# Altium PCB MD48-BC911-MCU-261020.PcbDoc
Units mm, origin at the board's own origin, x right, y up, seen from the top; angles counter-clockwise.
Board outline 124 x 22 mm, 4 copper layers (Top Layer, Mid-Layer1, Mid-Layer2, Bottom Layer), stack 0.778 mm thick; 83 components, 61 nets, 257 pads, 185 vias.
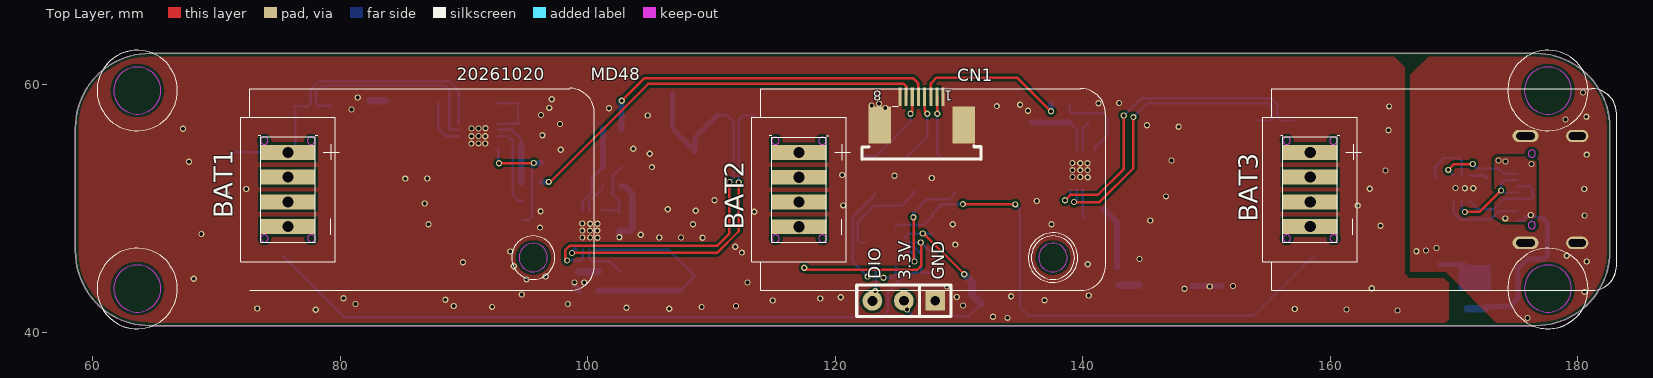
[diagram p0: Top Layer view]
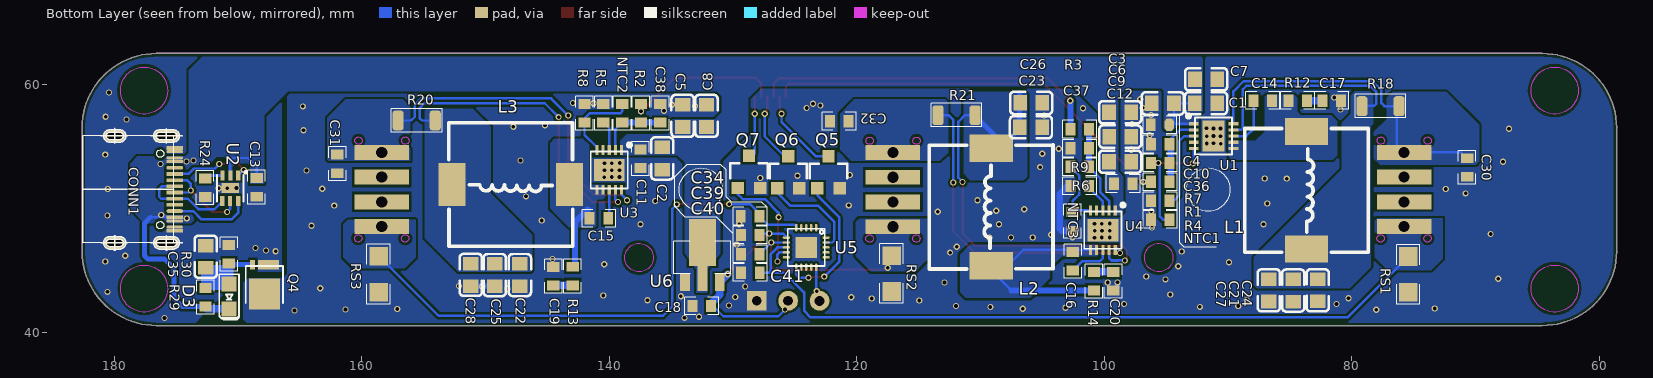
[diagram p1: Bottom Layer view, seen from below]

## Layer stack, top to bottom
Top Solder: solder mask 0.0102, Solder Resist, Dk 3.5
Top Layer: signal copper 0.0356
Dielectric 1: core 0.254, FR-4, Dk 4.2
Mid-Layer1: signal copper 0.036
Dielectric 3: prepreg 0.127, Dk 4.2
Mid-Layer2: signal copper 0.036
Dielectric 2: core 0.254, Dk 4.2
Bottom Layer: signal copper 0.0356
Bottom Solder: solder mask 0.0102, Solder Resist, Dk 3.5

## Board outline
58.602,46.52 58.602,56.52 cw(c64.602,56.52) 64.602,62.52 64.591,62.522 176.6,62.522 176.602,62.52 cw(c176.602,56.52) 182.602,56.52 182.602,46.52 cw(c176.602,46.52) 176.602,40.52 64.602,40.52 cw(c64.602,46.52)

## Design rules (kind name [scope] priority, off if disabled: settings)
Clearance [All] p1: gap=0.2 ignorepadtopadclearanceinfootprint=FALSE
ComponentClearance [All] p1: gap=0 collisioncheckmode=3 verticalgap=0 showdistances=FALSE
PlaneConnect [All] p1: planeconnectstyle=Direct reliefexpansion=0.508 reliefentries=4 reliefconductorwidth=0.254 reliefairgap=0.254
PolygonConnect [All] p1: connectstyle=Direct reliefconductorwidth=0.254 reliefentries=4 polygonreliefangle="90 Angle" airgapwidth=0.254
RoutingVias [All] p1: holewidth=0.711 width=1.27 viastyle="Through Hole" minholewidth=0.3 minwidth=0.5 maxholewidth=0.711 maxwidth=1.27
SilkToSilkClearance [All] p1: silktosilkclearance=0.1
SilkToSolderMaskClearance [IsPad] p1: minsilkscreentomaskgap=0.1 clearancetoexposedcopper=TRUE
SolderMaskExpansion [All] p1: expansion=0.102 istentingtop=FALSE
Width [All] p1: maxlimit=10 minlimit=0.1 preferedwidth=0.15
26 further rules are at their usual default settings.

## Classes and differential pairs
component class HUSB337+SW6201+SW6201+SW6201+PY32F031(1)(3): C1 C2 C3 C4 C5 C6 C7 C8 C9 C10 C11 C12 C14 C15 C16 C17 C18 C19 C20 C21 C22 C24 C25 C26 C27 C28 C30 C31 C32 CONN1 L1 L2 L3 NTC1 NTC2 NTC3 R1 R2 R3 R4 R5 R6 R7 R8 R9 R14 R18 R20 R21 RS1 U1 U3

## Components (designator, comment, footprint, x,y, rotation, side; value= is the part's Value field where it differs from the comment)
BAT1 "Comment" "电池座 -2-4PIN-2.0MM" 75.771,51.522 r90 top locked
BAT2 "Comment" "电池座 -2-4PIN-2.0MM" 117.081,51.512 r90 top locked
BAT3 "Comment" "电池座 -2-4PIN-2.0MM" 158.391,51.522 r90 top locked
C1 "10uF/16V X5R 10%" "SMD-C0805 锡膏" 90.88,58.5 r0 bottom locked (schematic designator C4)
C2 "10uF/16V X5R 10%" "SMD-C0805 锡膏" 135.73,53.13 r90 bottom locked
C3 "NC" "SMD-C0805 锡膏" 97.82,57.77 r0 bottom locked
C4 "NC" "SMD-C0805 锡膏" 96.17,58.48 r180 bottom locked (schematic designator C1)
C5 "NC" "SMD-C0805 锡膏" 134.08,58.37 r270 bottom locked
C6 "NC" "SMD-C0805 锡膏" 97.81,55.8 r0 bottom locked
C7 "NC" "SMD-C0805 锡膏" 90.87,60.43 r0 bottom locked
C8 "NC" "SMD-C0805 锡膏" 132.15,58.37 r270 bottom locked
C9 "10uF/16V X5R 10%" "SMD-C0805 锡膏" 97.82,53.77 r0 bottom locked
C10 "0.1uF" 0603#1 95.5,56.75 r180 bottom locked
C11 "0.1uF" 0603#2 137.48,54.02 r90 bottom locked
C12 "0.1uF" 0603#2 98.47,51.99 r0 bottom locked
C13 "1UF/50V" 0603#2 168.51,51.69 r270 bottom locked
C14 "0.1uF" 0603#2 87.2,58.7 r0 bottom locked
C15 "0.1uF" 0603#2 140.84,49.19 r180 bottom locked
C16 "0.1uF" 0603#2 102.54,45.72 r270 bottom locked
C17 "1nF" 0603#2 81.62,58.7 r0 bottom locked
C18 "NC" 0603#2 132.53,42.11 r0 bottom locked
C19 "1nF" 0603#2 144.53,44.52 r270 bottom locked
C20 "1nF" 0603#2 99.28,44.12 r90 bottom locked
C21 "22uF/16V X5R 10%" "SMD-C0805 锡膏" 84.73,42.46 r90 bottom locked
C22 "NC" "SMD-C0805 锡膏" 147.23,43.71 r90 bottom locked
C23 "22uF/16V X5R 10%" "SMD-C0805 锡膏" 105.03,56.55 r0 bottom locked (schematic designator C29)
C24 "22uF/16V X5R 10%" "SMD-C0805 锡膏" 82.76,42.48 r90 bottom locked (schematic designator C27)
C25 "22uF/16V X5R 10%" "SMD-C0805 锡膏" 149.26,43.71 r90 bottom locked
C26 "22uF/16V X5R 10%" "SMD-C0805 锡膏" 105.01,58.52 r0 bottom locked
C27 "NC" "SMD-C0805 锡膏" 86.71,42.47 r90 bottom locked (schematic designator C24)
C28 "22uF/16V X5R 10%" "SMD-C0805 锡膏" 151.2,43.72 r90 bottom locked
C30 "1UF/50V" 0603#2 70.68,53.3 r90 bottom locked
C31 "1uF/50V" 0603#2 161.98,53.59 r90 bottom locked
C32 "1UF/50V" 0603#2 121.43,57.04 r180 bottom locked
C34 "0.1uf/50v" 0603#2 128.63,49.36 r180 bottom locked (schematic designator C3)
C35 "10uF/16V X5R 10%" "SMD-C0805 锡膏" 172.62,45.19 r90 bottom locked (schematic designator C21)
C36 "10nF/50V" 0603#2 95.49,55.18 r180 bottom locked (schematic designator C14)
C37 "10nF/50V" 0603#2 101.98,54.85 r180 bottom locked (schematic designator C14)
C38 "10nF/50V" 0603#2 135.89,57.69 r270 bottom locked (schematic designator C14)
C39 "2.2uf/50v" 0603#2 128.62,47.85 r0 bottom locked (schematic designator C3)
C40 "0.1uf/50v" 0603#2 128.61,46.3 r180 bottom locked (schematic designator C3)
C41 "0.1uf/50v" 0603#2 128.6,44.8 r180 bottom locked (schematic designator C3)
CN1 "" 连接器0.5*8 127,57.87 r180 top locked
CONN1 "输入" "SMD-TYPEC_16Pin 卧式" 174.54,47.21 r0 bottom locked
D3 "1N4148" SOD-323 170.73,42.88 r90 bottom locked
L1 "4.7uH" "SMD-L WHC1040 锡膏" 83.66,56.2 r270 bottom locked
L2 "4.7uH" "SMD-L WHC1040 锡膏" 109.14,45.36 r90 bottom locked (schematic designator L3)
L3 "4.7uH" "SMD-L WHC1040 锡膏" 143.22,51.93 r0 bottom locked (schematic designator L2)
NTC1 "NC" 0603#2 95.49,49.09 r0 bottom locked (schematic designator NTC)
NTC2 "NC" 0603#2 138.96,57.69 r270 bottom locked (schematic designator R8)
NTC3 "NC" 0603#2 102.56,48.94 r270 bottom locked (schematic designator NTC2)
Q4 "SLN30N03T" DFN33-1 168.18,44.27 r0 bottom locked (schematic designator Q1)
Q5 "2N7002" SOT323 122.29,53.02 r90 bottom locked
Q6 "2N7002" SOT323 125.54,53.02 r90 bottom locked
Q7 "2N7002" SOT323 128.72,53.04 r90 bottom locked
R1 "10K" 0603#2 95.48,52.14 r0 bottom locked
R2 "10K" 0603#2 137.44,57.69 r90 bottom locked
R3 "10K" 0603#2 101.98,56.39 r0 bottom locked
R4 "820K" 0603#2 95.49,50.61 r0 bottom locked
R5 "820K" 0603#2 140.49,57.69 r90 bottom locked
R6 "820K" 0603#2 101.99,51.81 r0 bottom locked
R7 "NC" 0603#2 95.49,53.66 r180 bottom locked
R8 "NC" 0603#2 142.01,57.69 r90 bottom locked (schematic designator NTC1)
R9 "NC" 0603#2 101.99,53.35 r180 bottom locked
R12 "4.7R" 0603#2 84.38,58.7 r180 bottom locked
R13 "4.7R" 0603#2 142.97,44.53 r270 bottom locked
R14 "4.7R" 0603#2 100.84,44.11 r90 bottom locked
R18 "22mr" 1206A 77.68,58.26 r0 bottom locked
R20 "22mr" 1206A 155.57,57.1 r180 bottom locked
R21 "22mr" 1206A 111.94,57.53 r180 bottom locked
R24 "nc" 0603#2 172.67,51.67 r270 bottom locked (schematic designator R15)
R29 "20K" 0603#2 172.64,42.81 r90 bottom locked (schematic designator R4)
R30 "200K" 0603#2 170.75,46.3 r90 bottom locked (schematic designator R4)
RS1 "0.05R" 1206 75.43,44.66 r90 bottom locked (schematic designator R10)
RS2 "0.05R" 1206 117.19,44.73 r90 bottom locked (schematic designator R10)
RS3 "0.05R" 1206 158.65,44.67 r90 bottom locked (schematic designator R10)
U1 "BC911 DNF" "DFN33 - 10PIN" 91.17,55.84 r270 bottom locked
U2 "HUSB237" HUSB237 170.3,51.85 r270 bottom locked
U3 "BC911 DNF" "DFN33 - 10PIN" 140.01,53.1 r0 bottom locked
U4 "BC911 DNF" "DFN33 - 10PIN" 100.12,48.24 r0 bottom locked
U5 "WY8S8002A" QFN3*3-20 124.09,46.84 r270 bottom locked
U6 "ME6203A33PG" SOT-89 132.48,46.03 r90 bottom locked
? "UC2605" SIP3 128.09,42.53 r180 top locked

## Footprints (in the part's own frame and the unit in brackets; to place one, negate y for a bottom-side part, rotate by r counter-clockwise, add the part's x,y. Pads: shape width x height; smd on the part's side, far side on the other; paste and mask are expansions set on the pad)
0603#1 [mm]
  oct 0.8x1 smd: 1(0.75,0)
  rect 0.8x1 smd: 2(-0.75,0)
  silkscreen extent -1.37,-0.71 1.37,0.71
0603#2 [mm]
  rect 0.8x1 smd: 1(0.75,0) 2(-0.75,0)
  silkscreen extent -1.37,-0.71 1.37,0.71
1206 [mm]
  rect 1.5x1.5 smd: 1(1.448,0) 2(-1.448,0)
  silkscreen extent -2.41,-0.94 2.41,0.94
1206A [mm]
  rrect50% 0.9x1.6 smd mask+0.102: 1(1.5,0) 2(-1.5,0)
  silkscreen extent -2.05,-0.95 2.05,0.95
"DFN33 - 10PIN" [mm]
  rect 0.25x0.8 smd: 1(-1,-1.6) 2(-0.5,-1.6) 3(0,-1.6) 4(0.5,-1.6) 5(1,-1.6) 6(1,1.6) 7(0.5,1.6) 8(0,1.6) 9(-0.5,1.6) 10(-1,1.6)
  rect 2.5x1.8 smd: 11(0,0)
  silkscreen extent -1.66,-2.06 1.5,1.5
DFN33-1 [mm]
  rect 0.4x0.8 smd: 1(0.65,-1.175)
  rect 2.5x2.5 smd: 2(-0.3,1.175)
  rect 1.7x0.8 smd: 3(-0.65,-1.175)
  silkscreen extent -1.8,-1.07 1.2,1.93
HUSB237 [mil]
  rect 31.5x13.23 smd: "1 CC1"(-32,12) "2 VBUS"(-32,-13) "3 VSET"(-32,-38) "4 D+"(49,-39) "5 D-"(49,-14) "6 "(49,12)
  rect 31.5x55.12 smd: EP(8,-13)
  silkscreen extent -45,-56 50,40
QFN3*3-20 [mm]
  oval 0.6x0.2 smd: 1(-1.6,0.8) 2(-1.6,0.4) 3(-1.6,0) 4(-1.6,-0.4) 5(-1.6,-0.8) 11(1.6,-0.8) 12(1.6,-0.4) 13(1.6,0) 14(1.6,0.4) 15(1.6,0.8)
  oval 0.2x0.6 smd: 6(-0.8,-1.6) 7(-0.4,-1.6) 8(0,-1.6) 9(0.4,-1.6) 10(0.8,-1.6) 16(0.8,1.6) 17(0.4,1.6) 18(0,1.6) 19(-0.4,1.6) 20(-0.8,1.6)
  rect 1.7x1.7 smd: 21(0,0)
  silkscreen extent -1.5,-1.5 1.5,1.5
SIP3 [mm]
  rect 1.6x1.6 hole 0.8: 1(0,0)
  round 1.6 hole 0.8: 2(2.54,0)
  round 1.6 hole 0.813: 3(5.08,0)
  silkscreen extent -1.27,-1.27 6.35,1.27
"SMD-C0805 锡膏" [mm]
  rect 1.1x1.25 smd: 1(0,0) 2(1.8,0)
  silkscreen extent -0.8,-0.9 2.6,0.9, body extent -0.1,-0.64 1.9,0.61, height 1.25
"SMD-L WHC1040 锡膏" [mm]
  rect 2.2x3.5 smd: 1(0,0) 2(9.492,0)
  silkscreen extent -0.26,-5 9.75,5, body extent -0.45,-5 9.95,5, height 3.9
"SMD-TYPEC_16Pin 卧式" [mm]
  oval 2.1x1 hole 0.6 slot 1.5 at 0 deg: 0(1.253,-8.64) 0(1.253,0)
  oval 1.8x1 hole 0.6 slot 1.4 at 0 deg: 0(5.433,-8.64) 0(5.433,0)
  round 0.3 on Bottom Overlay: 0(8.033,-4.32)
  rect 1.34x0.3 smd: A1(0.583,-7.67) A5(0.583,-5.57) A6(0.583,-4.57) A7(0.583,-4.07) A8(0.583,-3.07) A12(0.583,-0.97) B4(0.583,-2.07) B6(0.583,-3.57) B7(0.583,-5.07)
  oval 1.34x0.25 smd: A4(0.583,-6.87) A9(0.583,-1.77) B12(0.583,-7.37)
  oval 1.3x0.25 smd: B1(0.583,-1.27)
  oval 1.34x0.3 smd: B5(0.583,-2.57) B8(0.583,-6.07)
  rect 1.34x0.25 smd: B9(0.583,-6.57)
  Keep-Out Layer circle w0.1: c1.753,-7.21 r0.3
  Keep-Out Layer circle w0.1: c1.753,-1.43 r0.3
  silkscreen extent -0.03,-9.25 8.03,0.64
SOD-323 [mm]
  rect 1.2x1.2 smd: 1(1,0) 2(-1,0)
  silkscreen extent -1.85,-0.8 1.8,0.8
SOT323 [mm]
  rect 1x1 smd: 1(-1.4,0.9) 2(1.2,0) 3(-1.4,-0.9)
  silkscreen extent -0.6,-1.5 0.6,1.5
SOT-89 [mm]
  rect 1.4x0.8 smd: 1(-2,1.4) 3(-2,-1.4)
  rect 5x0.8 smd: 2(-0.2,0)
  rect 3.8x2.2 smd: 2(1.225,0)
  silkscreen extent -1.3,-2.3 1.3,2.3
"电池座 -2-4PIN-2.0MM" [mm]
  rect 1.2x4.4 hole 0.9: 1(-3,0) 2(-1,0) 3(1,0) 4(3,0)
  Keep-Out Layer circle w0.1: c3.949,-1.883 r0.3
  Keep-Out Layer circle w0.1: c-3.951,1.892 r0.3
  Keep-Out Layer circle w0.1: c3.95,1.902 r0.3
  Keep-Out Layer circle w0.1: c-3.95,-1.898 r0.3
  silkscreen extent -4.25,-4.14 4.4,2.4
连接器0.5*8 [mm]
  rect 0.25x1.5 smd paste+0 mask+0.051: 1(-1.732,-1.132) 2(-1.232,-1.132) 3(-0.732,-1.132) 4(-0.232,-1.132) 5(0.268,-1.132) 6(0.768,-1.132) 7(1.268,-1.132) 8(1.768,-1.132)
  rect 1.8x3 smd paste+0 mask+0.051: 9(3.388,1.132) 10(-3.388,1.122)
  silkscreen extent -4.78,-0.38 4.83,3.9

## Part data
C1 C2 C3 C4 C5 C6 C7 C8 C9 C10 C11 C12 C13 C14 C15 C16 C17 C19 C20 C21 C22 C23 C24 C25 C26 C27 C28 C30 C31 C32 C34 C35 C36 C37 C38 C39 C40 C41: library part CAP0603, "Capacitor"
C18: library part Cap, "Capacitor"
CONN1: library part "TYPC C"
L1 L2 L3: library part INDUCTOR_SPM1010, "INDUCTOR"
NTC1 NTC3 R8: library part "Res Varistor", "Varistor (Voltage-Sensitive Resistor)"
NTC2 R1 R2 R3 R4 R5 R6 R7 R9 R12 R13 R14 R18 R20 R21 R24 R29 R30 RS1 RS2 RS3: library part RES_0603, "Resistor"
Q4: library part MOSFET-EH-P

## Via types
v1: diameter 0.5, hole 0.3, Top Layer to Bottom Layer, 185 vias

## Nets (pads, with @x,y where several pads share a name; then routed paths per layer and width w, separated by ;. In a path a pad name is that pad's centre, name@x,y a point inside that pad or via, vN(x,y) a via of type N, cw(c..) or ccw(c..) an arc to the next point about the centre after c; other vN are vias at no path point)
3.3V: ?.2 C18.2 C39.2 U5.6 U6.3 | length 17.5
  Top Layer w0.2: v1@127.115,47.995 v1(130.43,44.68)
  Bottom Layer w0.2: ?.2 125.55,42.07 126.34,41.28 130.8,41.28 C18.2@131.8,42.28 ; U5.6 125.69,47.68 125.97,47.96 v1(127.08,47.96) 127.76,47.96 C39.2
  Bottom Layer w0.6: v1(130.43,44.68) U6.3 131.08,43 C18.2@131.8,42.28
  other v1: 125.81,41.83
12V: "U2.2 VBUS" C1.2 C2.2 C3.2 C4.2 C5.2 C6.2 C7.2 C8.2 C9.2 C10.1 C11.1 C12.1 C13.2 CONN1.A4 CONN1.A9 CONN1.B4 CONN1.B9 D3.2 R29.2 U1.1 U3.1 U4.1 U6.2 | length 25.1
  Bottom Layer w0.2: C1.2 94.35,58.5 C4.2 94.37,56.93 94.46,56.84 U1.1 ; C13.2 168.51,53.37 169.21,54.07 170.42,54.07 170.63,53.86 170.63,52.663 ; R29.2 R29.2@172.73,42.06 ; CONN1.A9 175.696,48.98 175.696,49.303 176.496,49.303 176.519,49.28 177.1,49.28
  Bottom Layer w0.4: R29.2@172.73,42.06 174.52,42.06 175.17,42.71 175.17,45.14 175.93,45.9 177.3,45.9 177.57,46.17 177.57,48.81 177.1,49.28
  Bottom Layer w0.6: D3.2@171.06,41.87 172.54,41.87 R29.2@172.73,42.06
  other v1: 174.15,49.19 176.21,49.46 176.27,53.59 174.17,53.78 173.6,53.87
a1: "U2.3 VSET" R24.2 | length 1.5
  Bottom Layer w0.25: 171.265,52.663 172.427,52.663 R24.2
a2: 
a3: 
a4: C35.1 D3.1 Q4.1 R29.1 R30.2 | length 9.3
  Bottom Layer w0.4: Q4.1 170.645,45.445 R30.2 ; R30.2 171.11,45.19 C35.1 172.64,45.17 R29.1 172.32,43.88 D3.1 170.75,43.9 R30.2
a5: Q5.1 U5.11 | length 11.1
  Top Layer w0.2: v1(122.63,44.48) 123.82,44.48 v1(123.91,44.39)
  Bottom Layer w0.2: v1(122.63,44.48) 122.63,44.49 121.41,45.71 121.41,49.26 123.18,51.03 Q5.1@123.18,51.33 ; v1(123.91,44.39) 124.66,44.39 124.89,44.62 U5.11
a6: Q6.1 U5.19 | length 8
  Bottom Layer w0.2: U5.19 121.99,47.24 121.81,47.42 121.81,48.89 123.14,50.22 125.39,50.22 126.366,51.196 126.366,51.33 Q6.1@126.45,51.33
a7: Q7.1 U5.9 | length 9.5
  Top Layer w0.2: v1(126.32,49.28) 126.37,49.23 126.37,45.76 v1(126.42,45.71)
  Bottom Layer w0.2: U5.9 126.25,46.44 126.42,46.27 v1(126.42,45.71) ; v1(126.32,49.28) 126.32,49.64 127.42,50.74 129.22,50.74 129.64,51.16 Q7.1@129.64,51.33
A8: CONN1.A8
a9: ?.3 U5.15 | length 2.9
  Bottom Layer w0.2: ?.3@123.15,42.43 123.29,42.57 U5.15
  other v1: 123.24,43.31
B8: CONN1.B8
CC1: "U2.6 " CONN1.B5 | length 6.6
  Bottom Layer w0.2: 169.985,50.565 169.985,49.655 170.53,49.11 172.96,49.11 173.63,49.78 CONN1.B5
CC2: "U2.1 CC1" CONN1.A5 | length 6.7
  Top Layer w0.2: v1(169.55,53.108) 170.022,53.58 v1(171.52,53.58)
  Bottom Layer w0.2: v1@169.55,53.12 v1(169.55,53.108) 169.995,52.663 ; v1(171.52,53.58) 171.88,53.22 173.56,53.22 174,52.78 CONN1.A5
DM: "U2.5 D-" CONN1.A7 CONN1.B7 | length 7.9
  Top Layer w0.2: v1(170.89,49.71) 172.08,49.71 v1(173.82,51.45)
  Bottom Layer w0.2: 170.646,50.565 170.646,49.954 v1(170.89,49.71) ; CONN1.A7 173.99,51.28 v1(173.82,51.45) 173.82,51.97 174.13,52.28 CONN1.B7
DP: "U2.4 D+" CONN1.A6 CONN1.B6 | length 7.7
  Bottom Layer w0.2: 171.281,50.565 171.916,49.93 173.214,49.93 174.064,50.78 CONN1.B6 176.22,50.78 176.38,50.94 176.38,51.56 176.16,51.78 CONN1.A6
GND: ?.1 C1.1 C2.1 C3.1 C4.1 C5.1 C6.1 C7.1 C8.1 C9.1 C10.2 C11.2 C12.2 C17.2 C18.1 C19.2 C20.2 C21.1 C22.1 C23.1 C24.1 C25.1 C26.1 C27.1 C28.1 C30.2 C31.2 C32.2 C34.2 C36.2 C37.2 C38.2 C39.1 C40.2 C41.2 CN1.1 CN1.8 CN1.9 CN1.10 NTC1.1 NTC3.1 Q4.2 Q5.3 Q6.3 Q7.3 R4.1 R5.1 R6.1 R8.1 RS1.2 RS2.2 RS3.2 U1.11 U3.11 U4.11 U5.21 U6.1 | length 8.7
  Bottom Layer w0.5: v1(98.94,44.02) 98.94,43.71 C20.2 ; v1(102.56,47.66) NTC3.1 103.46,48.19 103.61,48.34 103.61,51.18 102.98,51.81 R6.1 ; C25.1@148.86,43.72 C28.1
  other v1: 133.93,41.15 132.75,41.24 165.45,41.74 78.03,41.81 161.32,41.83 157.14,41.86 73.3,41.9 106.59,41.88 103.13,41.97 109.21,42.02 92.28,42.04 89.18,42.11 111.99,42.11 130.33,42.15 81.23,42.27 98.4,42.27 114.96,42.55 136.92,42.57 88.5,42.62 118.79,42.71 80.27,42.73 120.45,42.82 129.83,42.84 134.22,42.9 140.49,42.95 94.67,43.04 148.23,43.5 163.37,43.54 129.03,43.68 150.28,43.68 152.16,43.73 99.72,44 112.92,44.01 95.06,44.26 68.17,44.31 96.61,44.49 94.02,45.32 140.41,45.49 89.93,45.64 144.6,45.91 112.46,46.42 93.75,46.51 111.93,46.9 129.71,47.07 100.2,47.64 100.8,47.63 109.29,47.63 99.57,47.65 105.79,47.65 107.54,47.65 104.29,47.86 68.78,47.93 99.57,48.2 100.19,48.2 100.78,48.2 96.15,48.44 164.08,48.6 87.14,48.72 108.52,48.71 129.5,48.72 137.49,48.71 100.2,48.75 100.79,48.75 99.56,48.78 145.47,49.02 113.46,49.73 96.2,49.76 108.74,49.81 106.47,49.92 162.23,50.22 120.65,50.24 86.83,50.4 136.29,50.6 110.25,50.66 146.73,50.97 70.8,51.21 72.41,51.56 163.2,51.59 85.26,52.4 87.03,52.42 127.81,52.46 139.18,52.54 139.81,52.53 140.41,52.52 124.79,52.64 120.58,52.7 164.48,53.06 139.18,53.09 139.8,53.09 140.39,53.09 105.19,53.33 139.81,53.64 140.4,53.64 139.17,53.67 67.78,53.77 147.18,53.86 105.01,54.42 97.83,54.74 103.68,54.82 90.6,55.23 91.17,55.25 91.72,55.24 90.61,55.83 91.17,55.84 91.72,55.83 96.34,55.91 164.71,56.31 67.29,56.44 90.62,56.46 91.17,56.46 91.75,56.47 147.76,56.6 145.2,56.72 97.77,56.82 104.85,57.51 96.23,57.55 135.58,57.88 80.92,57.98 101.73,58.09 96.89,58.12 124.06,58.11 164.77,58.24 133.07,58.26 122.95,58.31 134.95,58.37 123.54,58.45 141.29,58.49 142.95,58.51 97.1,58.82 81.42,58.95
GND1: C13.1 C35.2 CONN1.0@175.793,47.21 CONN1.0@175.793,55.85 CONN1.0@179.973,47.21 CONN1.0@179.973,55.85 CONN1.A1 CONN1.A12 CONN1.B1 CONN1.B12 Q4.3 R24.1 R30.1 U2.EP
  other v1: 175.96,41.14 180.56,43.25 180.74,45.71 179.12,46.17 166.97,46.53 167.75,46.6 168.59,46.79 180.57,49.42 180.54,51.56 170.89,51.62 171.56,51.63 170.14,51.64 180.74,54.34 179.02,57.18 180.71,57.4 180.44,59.36
LEDG_1: CN1.7 R1.1 | length 33.7
  Top Layer w0.2: v1(96.85,52.14) 96.978,52.14 104.908,60.07 125.54,60.07 125.732,59.878 CN1.7
  Bottom Layer w0.5: R1.1 v1(96.85,52.14)
LEDG_2: CN1.5 R3.1 | length 28.3
  Top Layer w0.2: v1(102.75,58.69) 104.59,60.53 126.3,60.53 126.732,60.098 CN1.5
  Bottom Layer w0.5: R3.1 102.73,58.67 v1(102.75,58.69)
LEDG_3: CN1.3 R2.1 | length 12.7
  Top Layer w0.2: CN1.3 127.732,60.102 128.2,60.57 134.71,60.57 135.87,59.41 v1(137.44,57.84)
  Bottom Layer w0.5: v1(137.44,57.84) R2.1
LEDR_1: CN1.6 Q5.2 | length 7
  Top Layer w0.2: v1(126.09,57.65) 126.232,57.792 CN1.6
  Bottom Layer w0.2: Q5.2 123.34,54.22 126.09,56.97 v1(126.09,57.65)
LEDR_2: CN1.4 Q6.2 | length 5.9
  Top Layer w0.2: CN1.4 127.232,57.858 v1(127.45,57.64)
  Bottom Layer w0.2: Q6.2@125.55,53.93 127.45,55.83 v1(127.45,57.64)
LEDR_3: CN1.2 Q7.2 | length 5.3
  Top Layer w0.2: CN1.2 128.232,57.668 v1(128.25,57.65)
  Bottom Layer w0.2: v1(128.25,57.65) 128.25,54.42 Q7.2@128.74,53.93
NetC14_1: C14.1 U1.8 | length 3.9
  Bottom Layer w0.2: C14.1@87.92,58.48 87.92,56.46 88.54,55.84 U1.8
NetC14_2: C14.2 L1.1 R12.2 U1.6 U1.7
NetC15_1: C15.1 U3.8 | length 2.3
  Bottom Layer w0.2: U3.8 140.01,49.99 140.01,49.27 C15.1
NetC15_2: C15.2 L3.1 R13.2 U3.6 U3.7 | length 5.1
  Bottom Layer w0.2: R13.2@142.97,45.21 R13.2
  Bottom Layer w0.5: 141.74,49.9 142.78,48.86 R13.2@142.78,45.28
NetC16_1: C16.1 U4.8 | length 3.5
  Bottom Layer w0.2: U4.8 100.12,45.97 100.36,45.73 101.78,45.73 C16.1
NetC16_2: C16.2 L2.1 R14.2 U4.6 U4.7 | length 17.2
  Bottom Layer w0.2: U4.7 U4.6 106.55,46.64 108.67,44.52 107.51,43.36
  Bottom Layer w0.5: R14.2 107.51,43.36
NetC17_1: C17.1 R12.1 | length 1.3
  Bottom Layer w0.6: C17.1 R12.1
NetC18_2: 
NetC19_1: C19.1 R13.1 | length 1.6
  Bottom Layer w0.6: R13.1 144.52,43.78 C19.1
NetC20_1: C20.1 R14.1 | length 1.6
  Bottom Layer w0.6: C20.1 99.29,44.86 R14.1
NetC21_2: C21.2 C24.2 C27.2 L1.2 R18.1 U1.9 | length 17.4
  Bottom Layer w0.2: R18.1@79.308,58.28 78.19,58.28 78.01,58.46 78.01,59.39 78.51,59.89 88.53,59.89 88.81,59.61 88.81,56.47 88.94,56.34 U1.9
NetC22_2: C22.2 C25.2 C28.2 L3.2 R20.1 U3.9 | length 25.1
  Top Layer w0.2: v1(139.31,50.51) 141.37,50.51 144.1,53.24 v1(144.1,57.37)
  Bottom Layer w0.2: v1(139.31,50.51) 139.51,50.71 U3.9 ; v1(144.1,57.37) 145.22,58.49 154.95,58.49 155.31,58.13 155.31,57.26 155.15,57.1 R20.1@154.122,57.1
NetC23_2: C23.2 C26.2 L2.2 R21.1 U4.9 | length 37.2
  Top Layer w0.2: v1@98.34,45.902 v1(98.34,45.79) 98.19,45.94 98.19,46.628 98.532,46.97 110.464,46.97 111.46,47.966 v1(111.46,52.13)
  Bottom Layer w0.2: v1(98.34,45.79) 99.42,45.79 99.62,45.99 ; 98.86,45.78 99.41,45.78 99.62,45.99 ; U4.9 99.62,45.99 ; R21.1@110.492,57.53 111.27,57.53 111.8,57 111.8,52.47 v1(111.46,52.13)
  Bottom Layer w0.4: C23.2@106.84,56.63 106.84,59.34 ; C23.2@106.97,56.3 108.67,54.6 108.67,55.708 R21.1@110.492,57.53
NetNTC1_2: NTC1.2 R7.2 U1.5 | length 9.9
  Top Layer w0.2: v1(92.84,53.64) 92.86,53.66 v1(95.65,53.66)
  Bottom Layer w0.2: U1.5 92.77,53.71 v1(92.84,53.64) ; NTC1.2 95.27,49.09 95.51,49.33 95.51,53.52 v1(95.65,53.66)
  Bottom Layer w0.5: v1(95.65,53.66) R7.2
NetNTC2_2: NTC2.2 R8.2 U3.5 | length 6.9
  Bottom Layer w0.2: NTC2.2 138.96,57.83 139.09,57.7 141.58,57.7 142.01,57.27 R8.2 142.01,55.94 141.01,54.94 U3.5
NetNTC3_2: NTC3.2 R9.2 U4.5 | length 5.7
  Bottom Layer w0.2: U4.5 102.41,49.84 NTC3.2 102.56,50.58 102.03,51.11 102.03,52.64 R9.2
NetQ1_1: 
NetR1_2: C36.1 R1.2 R7.1 U1.2 | length 5.7
  Bottom Layer w0.2: U1.2 93.898,56.34 94.63,55.608 C36.1@94.63,55.13
  Bottom Layer w0.5: R1.2@94.63,52.1 C36.1@94.63,55.13
NetR2_2: C38.1 NTC2.1 R2.2 U3.2 | length 5.5
  Bottom Layer w0.2: NTC2.1 139.51,56.39 U3.2
  Bottom Layer w0.5: C38.1 NTC2.1
NetR3_2: C37.1 R3.2 R9.1 U4.2 | length 7.2
  Bottom Layer w0.2: U4.2 99.62,50.61 100.34,51.33 100.34,52.45 R9.1
  Bottom Layer w0.5: R9.1 R3.2@101.24,56.41
NetR4_2: R4.2 U1.3 | length 6.7
  Bottom Layer w0.2: U1.3 93.43,55.84 93.54,55.84 93.95,55.43 93.95,51.05 94.39,50.61 R4.2
NetR5_2: R5.2 U3.3 | length 2.4
  Bottom Layer w0.2: U3.3 140.01,56.46 R5.2
NetR6_2: R6.2 U4.3 | length 2.4
  Bottom Layer w0.2: U4.3 100.12,50.544 101.24,51.664 R6.2
NetR15_2: 
NetR16_2: 
NetR17_2: 
NetR19_1: 
NetR22_1: 
NetR23_1: 
NewNet: 
RS1: BAT1.1 C41.1 RS1.1 U5.8 | length 59.9
  Bottom Layer w0.2: RS1.1 80.348,41.19 123.73,41.19 124.27,41.73 124.27,43.21 125.86,44.8 127.12,44.8 ; U5.8 126.416,46.84 126.97,46.286 126.97,44.95 127.12,44.8 ; C41.1 127.12,44.8
RS2: BAT2.1 C40.1 RS2.1 U5.7 | length 14.1
  Top Layer w0.2: v1(117.51,45.2) 117.67,45.04 126.64,45.04 126.97,45.37 126.97,47.19 v1(126.92,47.24)
  Bottom Layer w0.2: U5.7 v1(126.92,47.24) C40.1
RS3: BAT3.1 C34.1 RS3.1 U5.5 | length 45.1
  Top Layer w0.2: v1(130.32,50.34) 134.53,50.34 v1(134.55,50.32)
  Bottom Layer w0.2: U5.5 124.89,48.53 125.04,48.68 127.2,48.68 C34.1 127.88,49.59 128.63,50.34 v1(130.32,50.34) ; v1(134.55,50.32) 134.92,49.95 134.92,42.06 135.66,41.32 153.8,41.32 158.598,46.118 RS3.1
VBAT1: BAT1.4 C30.1 R18.2 U1.10 | length 26.7
  Bottom Layer w0.2: C30.1 71.152,54.522 BAT1.4 76.372,55.123 R18.2@76.372,57.91 ; R18.2@76.232,58.26 77.37,58.26 77.61,58.5 77.61,59.556 78.344,60.29 88.73,60.29 89.57,59.45 U1.10
VBAT2: BAT2.4 C32.1 R21.2 U4.10 | length 25.2
  Top Layer w0.2: v1(98.74,46.4) 110.46,46.4 112.21,48.15 v1(112.21,52.09)
  Bottom Layer w0.2: v1(98.74,46.4) 98.74,46.54 98.98,46.78 U4.10 ; v1@112.2,52.11 112.2,57.15 112.58,57.53 R21.2@113.388,57.53
VBAT3: BAT3.4 C31.1 R20.2 U3.10 | length 26.8
  Top Layer w0.2: v1(138.57,50.65) 139,51.08 141.22,51.08 143.33,53.19 v1(143.33,57.51)
  Bottom Layer w0.2: v1(138.57,50.65) 138.57,50.67 139.01,51.11 U3.10 ; v1(143.33,57.51) 144.71,58.89 ; 144.71,58.9 155.22,58.9 155.72,58.4 155.72,57.4 156.02,57.1 R20.2@157.018,57.1
VIN: 
pads on no net: BAT1.2 BAT1.3 BAT2.2 BAT2.3 BAT3.2 BAT3.3 CONN1.0@182.573,51.53 U1.4 U3.4 U4.4 U5.1 U5.2 U5.3 U5.4 U5.10 U5.12 U5.13 U5.14 U5.16 U5.17 U5.18 U5.20

## Polygon pours and split planes (outlines as drawn)
GND on Bottom Layer "Bottom Layer-No Net" (solid, remove dead copper, pour order 43): 62.09,40.52 169.05,40.52 169.42,40.89 169.58,41.05 169.58,42.58 169.58,43.97 169.2,44.35 166.41,44.35 166.24,44.52 166.05,44.71 166.05,45.35 166.05,61.42 164.81,62.66 62.39,62.66 58.66,58.93 58.59,58.86 58.59,43.97
GND1 on Bottom Layer "Bottom Layer-No Net" (solid, remove dead copper, pour order 38): 176.602,62.52 179.24,62.52 182.39,59.37 182.59,59.17 182.59,55.7 182.59,43.98 179.15,40.54 173.68,40.54 169.53,44.69 169.35,44.87 166.57,44.87 166.47,44.97 166.47,46.83 166.47,60.78 168.16,62.47
12V on Bottom Layer "Bottom Layer-No Net" (solid, remove dead copper, pour order 34): 173.806,48.81 177.57,48.81 178.7,49.94 178.7,50.96 178.7,53.64 178.29,54.05 178.12,54.22 175.41,54.22 174.27,54.22 174.09,54.4 174.01,54.48 174.01,55.65 174.01,61.16 172.67,62.5 92.39,62.5 92.04,62.15 92.04,57.86 92.29,57.61 92.38,57.52 92.38,56.71 94.08,56.71 94.55,56.24 94.99,56.24 95.18,56.43 95.18,59.49 95.2,59.51 95.41,59.72 95.65,59.72 98.19,59.72 98.54,59.37 98.86,59.05 98.86,57.8 98.86,52.97 98.57,52.68 98.48,52.59 98.48,51 98.48,49.7 98.69,49.49 98.74,49.44 99.22,49.44 99.22,50.84 99.51,51.13 99.96,51.58 99.96,51.85 99.96,52.76 100.27,53.07 100.42,53.22 100.42,55.9 100.42,57.74 101.24,58.56 102.54,59.86 108.89,59.86 127.82,59.86 128.34,59.34 128.79,58.89 128.79,57.47 128.79,56.13 131.02,53.9 131.02,46.333 132.07,45.075 132.07,43.19 132.97,43.19 132.97,45.075 133.89,46.364 133.89,53.69 134.51,54.31 139.12,54.31 139.12,55.47 138.96,55.63 138.6,55.99 138.23,55.99 135.32,55.99 135.05,56.26 134.88,56.43 134.88,57.21 131.46,57.21 131.15,57.52 130.9,57.77 130.9,58.45 130.9,59.04 131.14,59.28 131.34,59.48 131.49,59.48 165.93,59.48 167.91,57.5 167.91,51.99 169.04,51.99 169.04,53.43 169.19,53.58 169.24,53.63 169.8,53.63 170.19,53.63 170.29,53.53 170.46,53.36 170.46,52.26 170.79,52.26 170.81,52.28 170.8,52.29 170.8,53.5 170.8,53.85 170.95,54 171.12,54.17 171.72,54.17 173.57,52.32 173.57,49.01
RS3 on Bottom Layer "Bottom Layer-No Net" (solid, remove dead copper, pour order 33): 155.64,49.12 155.64,46.03 156.08,45.59 156.52,45.15 159.91,45.15 160.62,45.15 160.91,45.44 161.52,46.05 161.52,47.83 161.52,48.7 161.16,49.06
RS2 on Bottom Layer "Bottom Layer-No Net" (solid, remove dead copper, pour order 32): 114.33,49.14 114.33,45.84 114.74,45.43 115.26,44.91 117.44,44.91 118.87,44.91 119.47,45.51 120.07,46.11 120.07,46.99 120.07,48.91 119.82,49.16
RS1 on Bottom Layer "Bottom Layer-No Net" (solid, remove dead copper, pour order 31): 72.64,49.2 72.64,45.94 73.26,45.32 73.57,45.01 75.74,45.01 77.12,45.01 77.59,45.48 78.14,46.03 78.14,47.08 78.14,48.99 77.93,49.2
NetC21_2 on Bottom Layer "Bottom Layer-No Net" (solid, remove dead copper, pour order 42): 87.69,43.56 80.16,43.56 79.65,44.07 78.45,45.27 78.45,48.3 78.45,56.63 78.26,56.82 78.26,59.02 78.26,59.18 78.48,59.4 78.54,59.46 79.41,59.46 79.76,59.46 79.98,59.24 80.07,59.15 80.07,58.11 80.07,57.65 80.25,57.47 80.83,56.89 80.83,55.94 80.83,53.14 82.11,51.86 87.91,46.06 87.91,43.78
NetC14_2 on Bottom Layer "Bottom Layer-No Net" (solid, remove dead copper, pour order 39): 89.97,55.47 87.79,55.47 87.3,55.96 87.05,56.21 87.05,58.38 87.05,59.03 86.89,59.19 84.66,59.19 84.5,59.03 84.42,58.95 84.42,57.99 84.42,57.82 84.13,57.53 84.04,57.53 81.68,57.53 81.55,57.4 81.19,57.04 81.19,55.79 81.19,54.29 81.39,54.09 81.56,53.92 89.39,53.92 89.73,53.92 89.96,54.15
NetC15_2 on Bottom Layer "Bottom Layer-No Net" (solid, remove dead copper, pour order 36): 140.38,51.91 140.38,50.89 140.49,50.78 140.52,50.75 140.88,50.75 141.06,50.58 141.06,48.54 141.11,48.49 143.28,48.49 144.37,49.58 144.79,50 144.79,53.01 144.79,55.28 144.57,55.5 144.44,55.63 143.71,55.63 142.05,55.63 141.81,55.39 141.64,55.22 141.64,52.08 141.47,51.91
VBAT1 on Bottom Layer "Bottom Layer-No Net" (solid, remove dead copper, pour order 40): 77.19,58.92 77.19,57.21 77.23,57.17 78.21,56.19 78.21,55.19 78.21,54.01 78.03,53.83 77.71,53.51 70.76,53.51 70,53.51 69.86,53.65 69.72,53.79 69.72,54.66 69.72,56.78 72.26,59.32 72.37,59.43 76.67,59.43
NetC16_2 on Bottom Layer "Bottom Layer-No Net" (solid, remove dead copper, pour order 44): 100.49,47.05 110.87,47.05 111.08,46.84 111.66,46.26 111.66,44.47 111.66,43.23 111.51,43.08 111.19,42.76 110.52,42.76 105.99,42.76 105.58,43.17 104.4,44.35 104.4,44.93 104.4,45.15 103.73,45.82 103.43,46.12 100.71,46.12 100.62,46.12 100.5,46.24
NetC23_2 on Bottom Layer "Bottom Layer-No Net" (solid, remove dead copper, pour order 45): 106.23,59.23 106.23,52.56 106.5,52.29 110.85,52.29 111.03,52.47 111.38,52.82 111.38,55.67 111.38,58.74 111,59.12 110.7,59.42 106.45,59.42
NetC22_2 on Bottom Layer "Bottom Layer-No Net" (solid, remove dead copper, pour order 46): 152.23,44.89 154.93,47.59 154.93,57.56 154.93,57.88 154.76,58.05 151.03,58.05 149.58,56.6 149.58,54.71 149.58,51.21 146.25,47.88 146.25,44.89
VBAT3 on Bottom Layer "Bottom Layer-No Net" (solid, remove dead copper, pour order 47): 156.1,53.83 156.1,58.22 156.45,58.57 156.68,58.8 160.32,58.8 161.31,58.8 162.16,57.95 162.8,57.31 162.8,54.49 162.8,53.96 162.67,53.83
VBAT2 on Bottom Layer "Bottom Layer-No Net" (solid, remove dead copper, pour order 48): 112.63,58.55 112.63,54.51 113.31,53.83 120.45,53.83 121.36,54.74 121.36,57.66 120.21,58.81 112.87,58.81
GND on Top Layer "Bottom Layer-No Net" (solid, remove dead copper, pour order 41): 62.09,40.52 169.05,40.52 169.42,40.89 169.58,41.05 169.58,42.58 169.58,43.97 169.2,44.35 166.41,44.35 166.24,44.52 166.05,44.71 166.05,45.35 166.05,61.42 164.81,62.66 62.39,62.66 58.66,58.93 58.59,58.86 58.59,43.97
GND1 on Top Layer "Bottom Layer-No Net" (solid, remove dead copper, pour order 37): 176.602,62.52 179.24,62.52 182.39,59.37 182.59,59.17 182.59,55.7 182.59,43.98 179.15,40.54 173.68,40.54 169.53,44.69 169.35,44.87 166.57,44.87 166.47,44.97 166.47,46.83 166.47,60.78 168.16,62.47
12V on Top Layer "Bottom Layer-No Net" (solid, remove dead copper, pour order 35): 173.26,49.37 173.26,53.97 173.45,54.16 175.91,54.16 176.23,54.16 176.54,53.85 176.64,53.75 176.64,49.37 176.19,48.92 176.17,48.9 174.02,48.9

## Keep-outs
Keep-Out Layer:
  circle w0.1: c95.602,46.02 r1.15
  circle w0.1: c137.602,46.02 r1.15
  circle w0.1: c177.602,59.52 r1.9
  circle w0.1: c177.602,43.52 r1.9
  circle w0.1: c63.602,59.52 r1.9
  circle w0.1: c63.602,43.52 r1.9
  lines w0.1: 64.591,62.522 176.6,62.522 ; 64.602,40.52 cw(c64.602,46.52) 58.602,46.52 58.602,56.52 cw(c64.602,56.52) 64.602,62.52 ; 64.614,40.52 176.602,40.52 ccw(c176.602,46.52) 182.602,46.52 182.602,56.52 ccw(c176.602,56.52) 176.602,62.52

## Other copper
Bottom Layer:
  rectangle net a4: 170.39,43.4 173.01,45.43

## Silkscreen, mask and mechanical layers (free items; w line width, h text height)
Top Overlay:
  circle w0.1: c95.602,46.02 r1.75
  circle w0.1: c137.602,46.02 r1.75
  circle w0.1: c137.602,46.02 r2
  circle w0.1: c137.602,46.02 r2
  circle w0.1: c63.602,59.52 r3.25
  circle w0.1: c63.602,43.52 r3.25
  circle w0.1: c137.602,46.02 r1.75
  circle w0.1: c177.602,59.52 r3.25
  circle w0.1: c177.602,43.52 r3.25
  lines w0.1: 60.755,41.952 ccw(c63.602,43.52) 64.851,40.519 ; 60.755,61.087 cw(c63.602,59.52) 64.851,62.52 ; 72.702,43.37 98.552,43.37 ccw(c98.552,45.37) 100.552,45.37 100.552,57.708 ccw(c98.558,57.708) 98.558,59.702 ; 72.702,57.392 72.702,59.67 98.558,59.67 ; 114.002,45.67 114.002,43.37 139.852,43.37 ccw(c139.852,45.37) 141.852,45.37 141.852,57.67 ; 114.002,57.37 114.002,59.67 139.852,59.67 ; 139.842,59.67 cw(c139.842,57.67) 141.842,57.67 ; 155.302,43.37 181.152,43.37 ccw(c181.152,45.37) 183.152,45.37 ; 155.302,43.38 155.302,45.658 ; 155.302,57.378 155.302,59.67 181.152,59.67 cw(c181.152,57.67) 183.152,57.67 ; 175.722,43.37 179.482,43.37 ; 175.722,59.67 179.482,59.67 ; 176.352,40.519 ccw(c177.602,43.52) 180.449,41.952 ; 181.735,43.457 ccw(c181.152,45.37) 183.152,45.37 ; 181.735,59.583 cw(c181.152,57.67) 183.152,57.67 ; 183.152,45.37 183.152,57.67 ; 183.152,45.37 183.152,57.67 ; 71.955,45.67 79.608,45.67 79.608,57.37 71.955,57.37 71.955,45.67 ; 113.255,45.67 113.255,57.37 120.908,57.37 120.908,45.67 113.255,45.67 ; 154.555,45.67 154.555,57.37 162.208,57.37 162.208,45.67 154.555,45.67
  text "20261020" at 89.4,60.37 h1
  text "MD48" at 100.26,60.35 h1
  text "DIO" at 123.69,44.26 h1 r90
  text "GND" at 128.83,44.23 h1 r90
  text "3.3V" at 126.12,44.2 h1 r90
Bottom Overlay:
  circle w0.1: c91.602,51.516 r1.75
  circle w0.1: c132.602,51.516 r1.75
  lines w0.1: 90.97,46.85 93.55,46.85 93.9,47.2 93.9,57.58 ; 127.258,50.071 127.697,50.51 130.13,50.51 130.57,50.95 130.57,53.12 130.99,53.54 133.73,53.54 134.71,52.56 134.71,50.15 133.85,49.29 131.33,49.29 129.982,47.942 129.982,45.589

## Text inside footprints (layer, text, board x,y; h text height)
CN1: Top Overlay "8" at 123.779,59.51 h0.8 r180; Top Overlay "1" at 129.494,59.51 h0.8 r180